# Altium PCB COMECA-PCBv1.PcbDoc
Units mm, origin at the board's own origin, x right, y up, seen from the top; angles counter-clockwise.
Board outline 163.58 x 161.29 mm, 2 copper layers (Top Layer, Bottom Layer); 102 components, 84 nets, 417 pads, 28 vias.
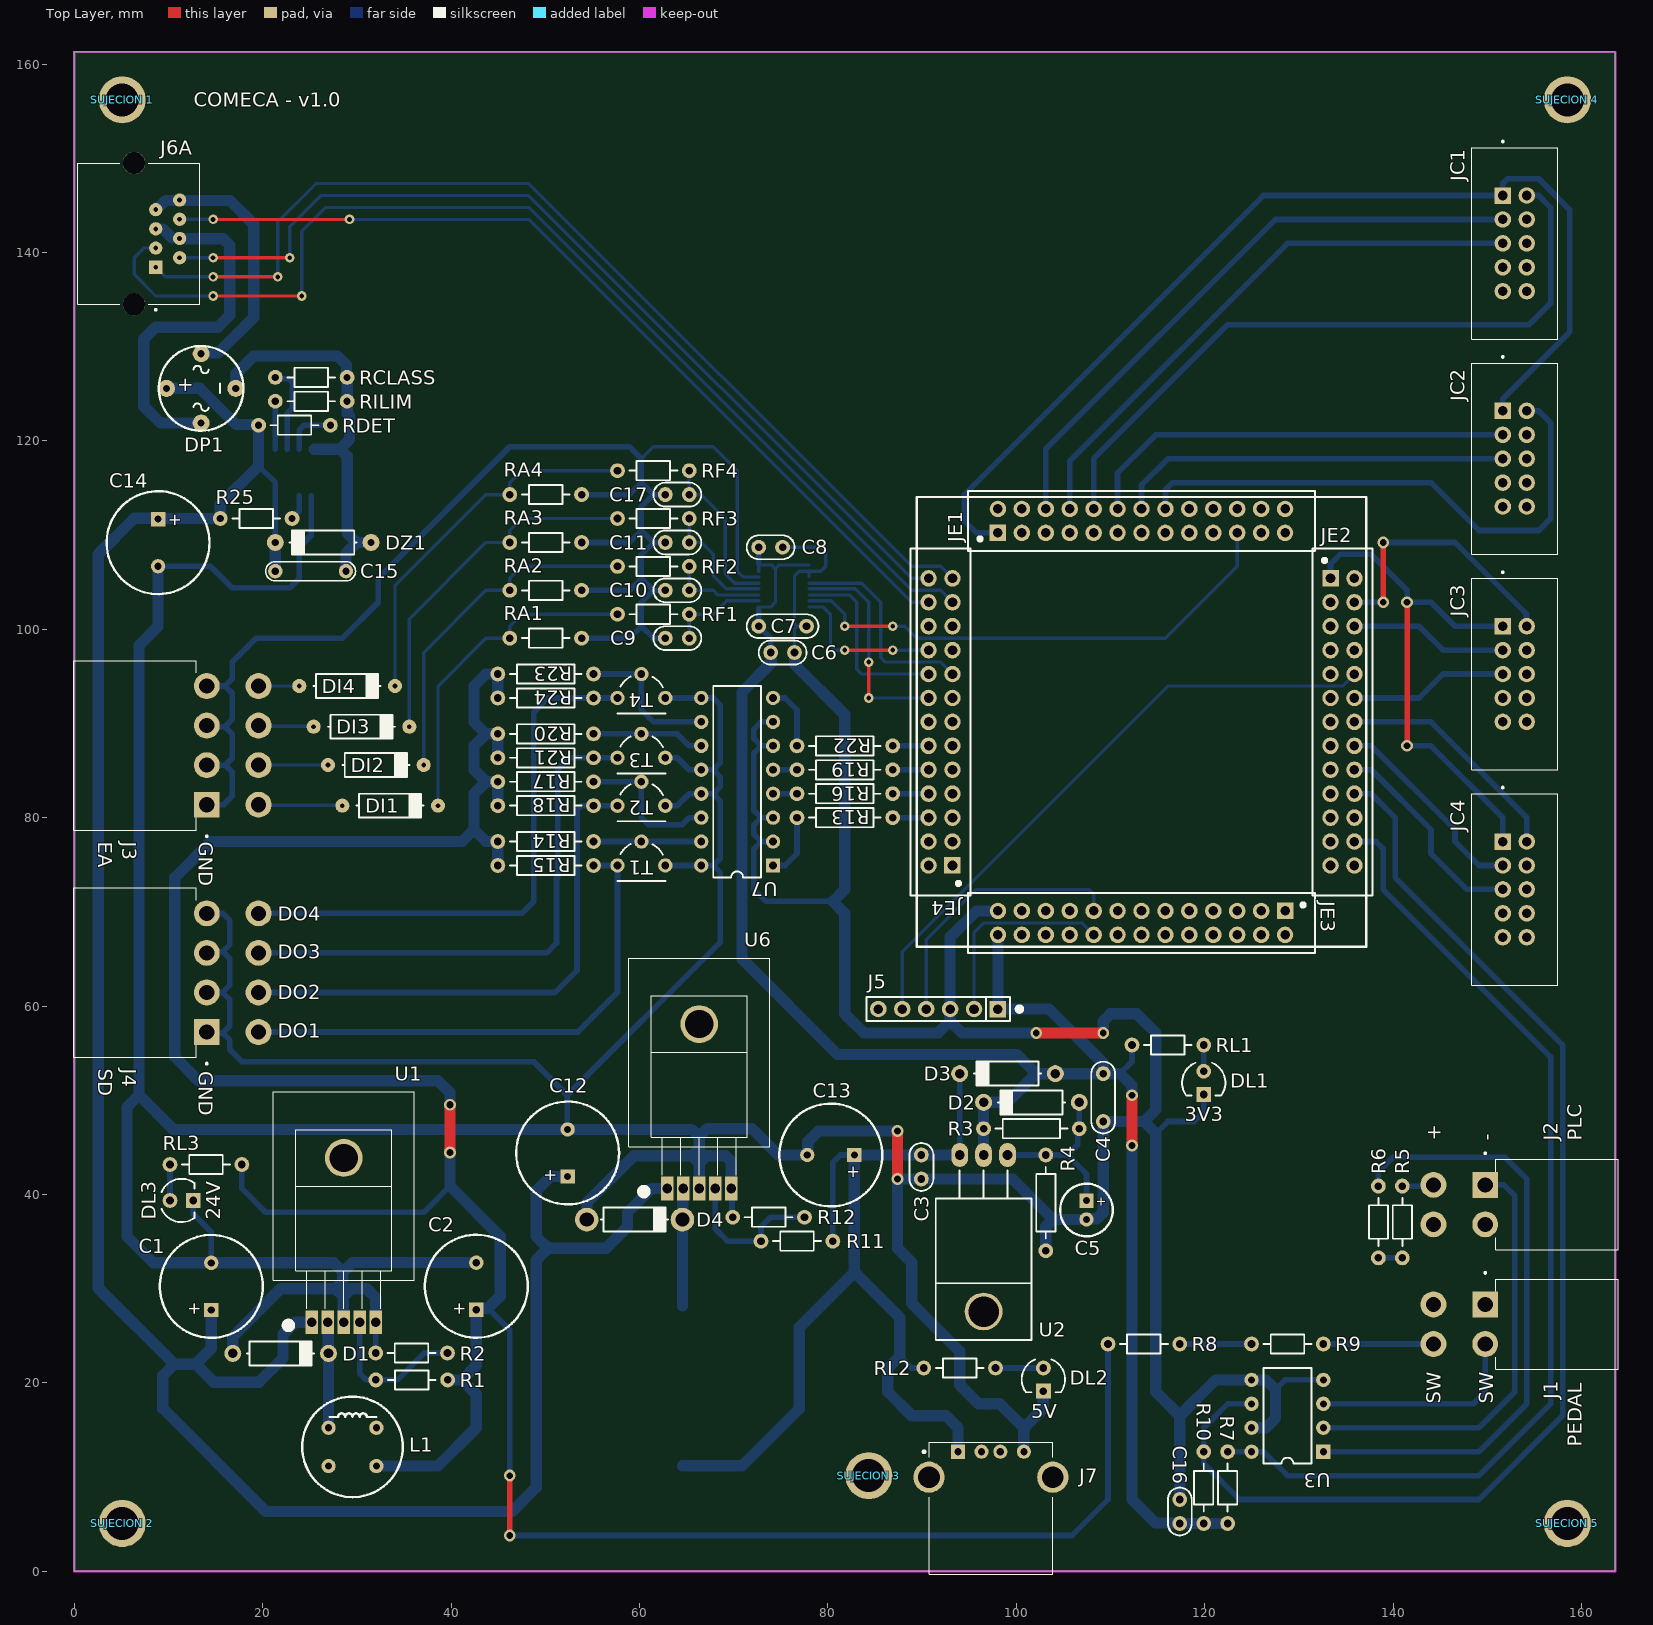
[diagram p0: Top Layer view]
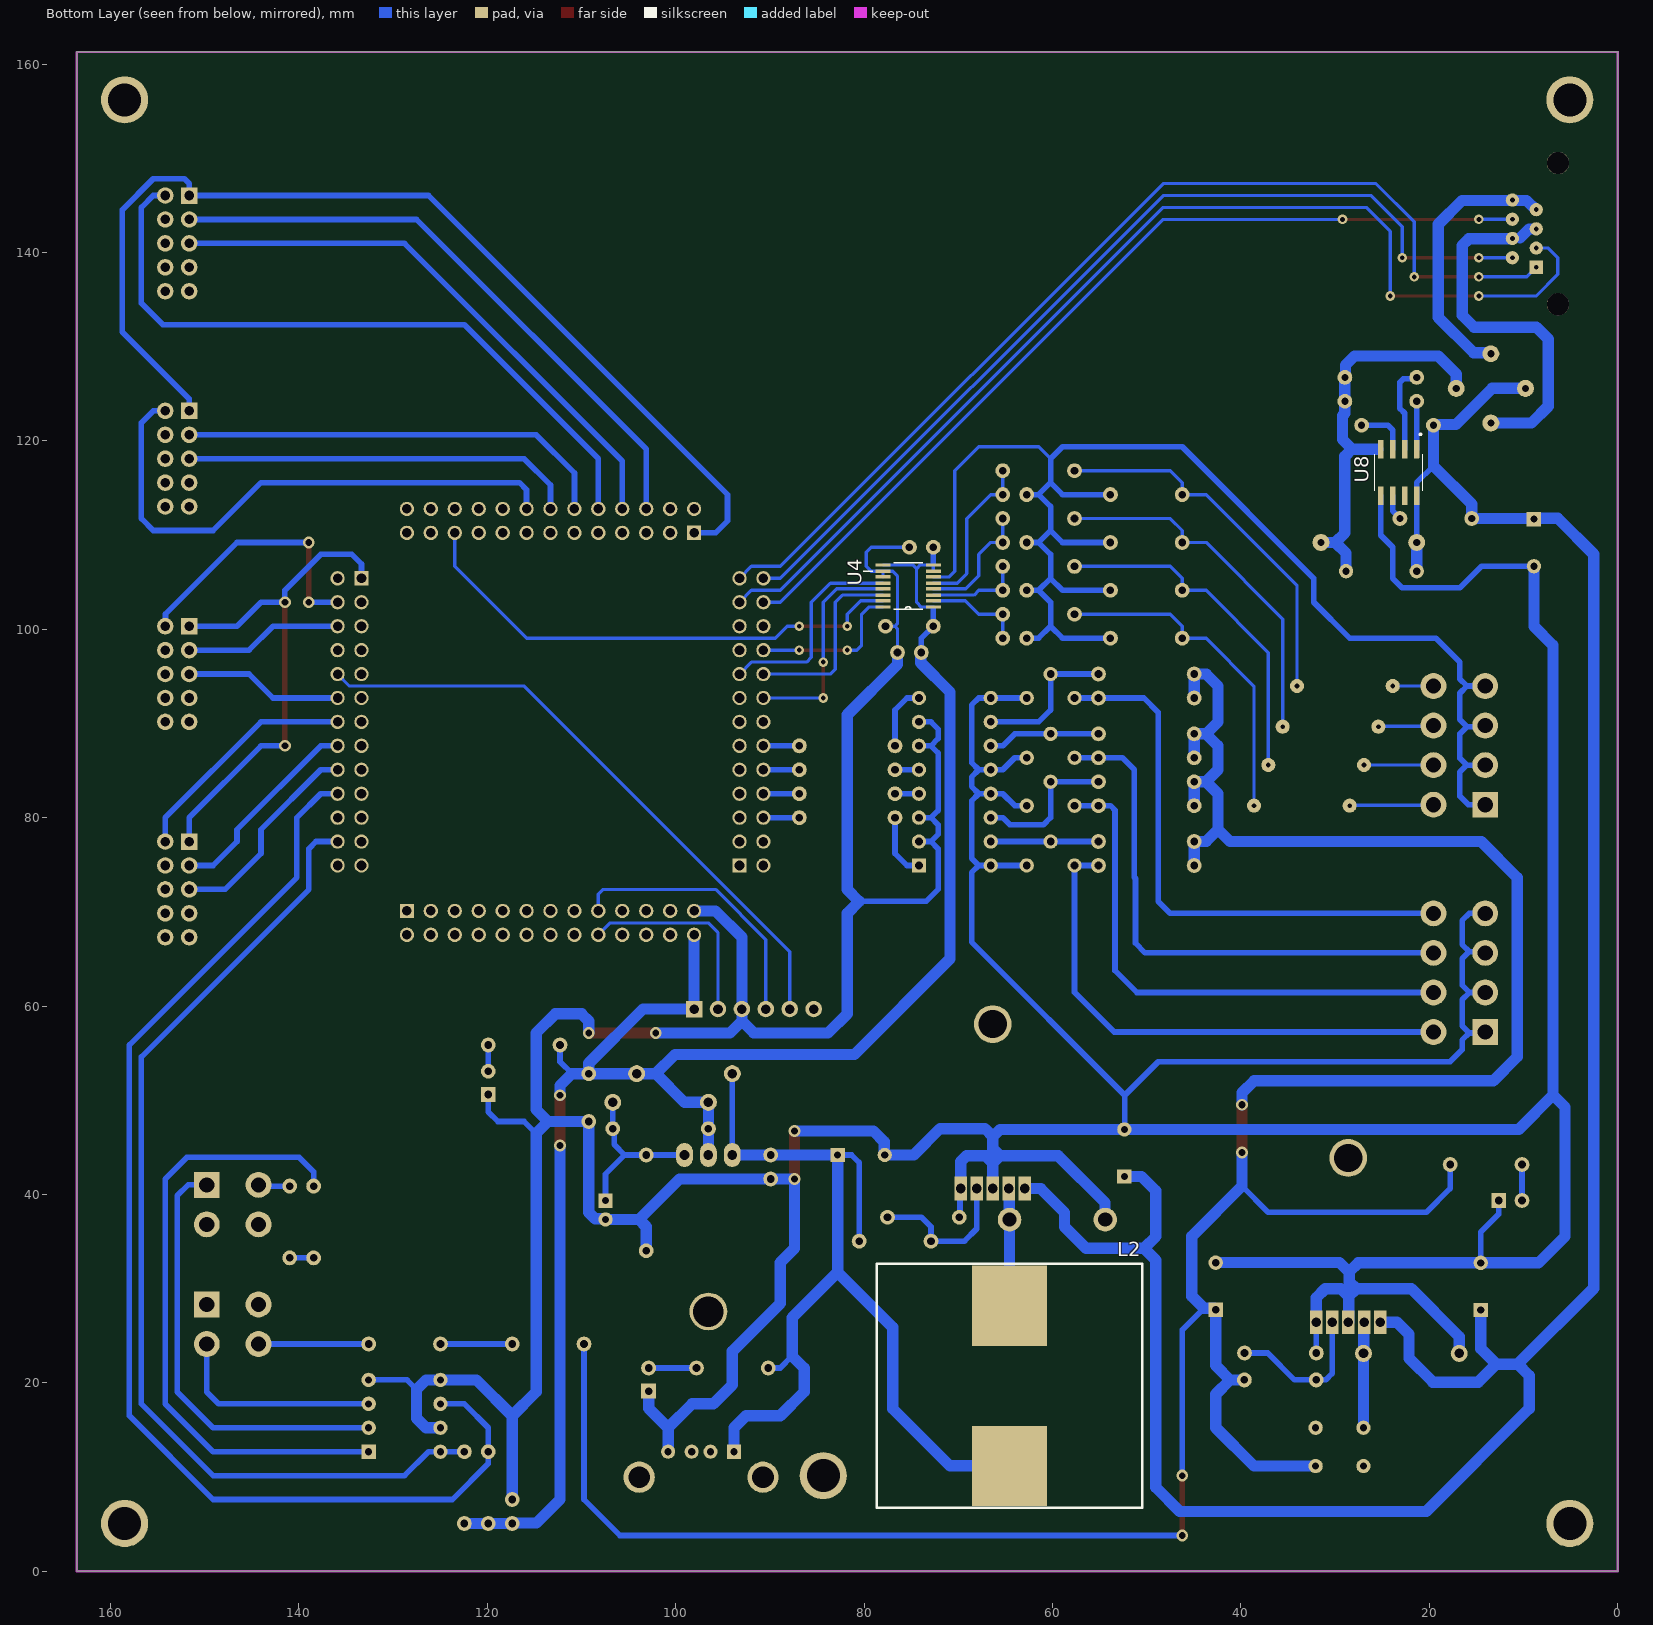
[diagram p1: Bottom Layer view, seen from below]

## Layer stack, top to bottom
Top Solder: solder mask 0.0102, Solder Resist, Dk 3.5
Top Layer: signal copper 0.0356
Dielectric 1: dielectric 0.32, FR-4, Dk 4.8
Bottom Layer: signal copper 0.0356
Bottom Solder: solder mask 0.0102, Solder Resist, Dk 3.5

## Board outline
0,0 163.576,0 163.576,161.29 0,161.29

## Design rules (kind name [scope] priority, off if disabled: settings)
Clearance [All] p1: gap=0.254 ignorepadtopadclearanceinfootprint=TRUE
ComponentClearance [All] p1: gap=0.22 collisioncheckmode=3 verticalgap=0.254 showdistances=FALSE
PolygonConnect [All] p1: connectstyle=Relief reliefconductorwidth=0.254 reliefentries=4 polygonreliefangle="90 Angle" airgapwidth=0.254
RoutingVias [All] p1: holewidth=0.711 width=1.25 viastyle="Through Hole" minholewidth=0.508 minwidth=1 maxholewidth=0.711 maxwidth=1.25
SolderMaskExpansion [All] p1: expansion=0.102 istentingtop=FALSE
Width [All] p1: maxlimit=1.8 minlimit=0.35 preferedwidth=0.6
29 further rules are at their usual default settings.

## Classes and differential pairs
component class COMECA_Main: "SUJECION 1" "SUJECION 2" "SUJECION 3" "SUJECION 4" "SUJECION 5"
component class U_UnidadDeControl-STM: J5 JE1 JE2 JE3 JE4
component class U_SalidasDigitales: J4 R13 R14 R15 R16 R17 R18 R19 R20 R21 R22 R23 R24 T1 T2 T3 T4 U7
component class U_Fuente24VDC: C1 C2 D1 DL3 L1 R1 R2 RL3 U1
component class U_Fuente5VDC: C12 C13 D4 DL2 J7 L2 R11 R12 RL2 U6
component class U_Fuente3.3VDC: C3 C4 C5 D2 D3 DL1 R3 R4 RL1 U2
component class U_EntradasAnalogicas: C6 C7 C8 C9 C10 C11 C17 DI1 DI2 DI3 DI4 J3 RA1 RA2 RA3 RA4 RF1 RF2 RF3 RF4 U4
component class U_ControladorPOE: C14 C15 DP1 DZ1 J6A R25 RCLASS RDET RILIM U8
component class U_ComandosExt: C16 J1 J2 R5 R6 R7 R8 R9 R10 U3
component class U_Calibres: JC1 JC2 JC3 JC4

## Components (designator, comment, footprint, x,y, rotation, side; value= is the part's Value field where it differs from the comment)
C1 "100uFx100V" CAP200RP 14.537,30.245 r90 top
C2 "220uFx50V" CAP200RP 42.671,30.265 r90 top
C3 "0.1uF" CAP100 89.916,42.926 r270 top
C4 "1uF" CAP200 109.22,50.292 r270 top
C5 "10uFx25V" CAP100RP 107.442,38.354 r270 top
C6 "0.1uF" CAP100 75.184,97.536 r0 top
C7 "1uF" CAP200 75.184,100.33 r0 top
C8 "0.1uF" CAP100 73.914,108.712 r0 top
C9 "0.1uF" CAP100 64.008,99.06 r180 top
C10 "0.1uF" CAP100 64.008,104.14 r180 top
C11 "0.1uF" CAP100 64.008,109.22 r180 top
C12 "100uFx100V" CAP200RP 52.364,44.41 r90 top
C13 "680uFx25V" CAP200RP 80.304,44.196 r180 top
C14 "100uFx100V" CAP200RP 8.89,109.199 r270 top
C15 "0.1uFx100V" CAP300 25.086,106.172 r0 top
C16 "0.1uF" CAP100 117.348,6.35 r90 top
C17 "0.1uF" CAP100 64.008,114.3 r180 top
D1 "MUR110" DO41#1 21.903,23.133 r0 top
D2 "1N4007" DO41#1 101.6,49.784 r180 top
D3 "1N4007" DO41#1 99.06,52.832 r180 top
D4 "MUR410" DO41#2 59.476,37.338 r0 top
DI1 "1N4148" DO41#3 33.528,81.28 r0 top
DI2 "1N4148" DO41#3 32.004,85.598 r0 top
DI3 "1N4148" DO41#3 30.48,89.662 r0 top
DI4 "1N4148" DO41#3 28.956,93.98 r0 top
DL1 "3V3" LED3 119.888,51.867 r270 top
DL2 "5V" LED3 102.87,20.371 r270 top
DL3 "24V" LED3 11.379,39.37 r0 top
DP1 "W10M" "PUENTE - W10M" 9.785,125.576 r90 top
DZ1 "1N4758" DO41#4 26.416,109.22 r180 top
J1 "PEDAL" TE_1586863-4 149.772,28.33 r90 top
J2 "PLC" TE_1586863-4 149.772,41.03 r90 top
J3 "ANALOG IN" TE_1586863-8 14.058,81.38 r270 top
J4 "DIGITAL OUT" TE_1586863-8 14.058,57.25 r270 top
J5 "PROGRAMMER" SIP6 98.044,59.69 r180 top
J6A "RJ45" CUI_CRJ032-1-TH 6.336,142 r270 top
J7 "USB-TYPE-A" TE_6364372-2 97.298,9.99 r0 top
JC1 "CAL_1" "TE_5104338-1 - 90DEG" 151.638,146.05 r90 top locked
JC2 "CAL_2" "TE_5104338-1 - 90DEG" 151.638,123.19 r90 top locked
JC3 "CAL_3" "TE_5104338-1 - 90DEG" 151.638,100.33 r90 top locked
JC4 "CAL_4" "TE_5104338-1 - 90DEG" 151.638,77.47 r90 top locked
JE1 "SIP13" "SIP13*2 - HDR" 98.044,110.236 r0 top
JE2 "SIP13" "SIP13*2 - HDR" 133.35,105.41 r270 top
JE3 "SIP13" "SIP13*2 - HDR" 128.524,70.104 r180 top
JE4 "SIP13" "SIP13*2 - HDR" 93.218,74.93 r90 top
L1 "2200uH" CHOKE10.5 29.523,13.208 r0 top
L2 "220uH" CHOKE_PAD 64.556,19.694 r180 bottom
R1 "1K" RES300#1 32.004,20.32 r0 top
R2 "18K" RES300#1 31.985,23.173 r0 top
R3 "240" RES400 106.68,46.99 r180 top
R4 "390" RES400 103.124,34.036 r90 top
R5 "1K" RES300#1 140.97,40.894 r270 top
R6 "150" RES300#1 138.43,33.274 r90 top
R7 "680" RES300#1 122.428,12.7 r270 top
R8 "1K" RES300#1 109.728,24.13 r0 top
R9 "150" RES300#1 124.968,24.13 r0 top
R10 "680" RES300#1 119.888,12.7 r270 top
R11 "1K" RES300#1 72.898,35.052 r0 top
R12 "3.09K" RES300#1 69.89,37.592 r0 top
R13 "220" RES400 86.868,80.01 r180 top
R14 "4K7" RES400 55.118,77.47 r180 top
R15 "4K7" RES400 55.118,74.93 r180 top
R16 "220" RES400 86.868,82.55 r180 top
R17 "4K7" RES400 55.118,83.82 r180 top
R18 "4K7" RES400 55.118,81.28 r180 top
R19 "220" RES400 86.868,85.09 r180 top
R20 "4K7" RES400 55.118,88.9 r180 top
R21 "4K7" RES400 55.118,86.36 r180 top
R22 "220" RES400 86.868,87.63 r180 top
R23 "4K7" RES400 55.118,95.25 r180 top
R24 "4K7" RES400 55.118,92.71 r180 top
R25 "100K" RES300#2 23.114,111.76 r180 top
RA1 "150" RES300#1 53.848,99.06 r180 top
RA2 "150" RES300#1 53.848,104.14 r180 top
RA3 "150" RES300#1 53.848,109.22 r180 top
RA4 "150" RES300#1 53.848,114.3 r180 top
RCLASS "4K42" RES300#2 28.956,126.746 r180 top
RDET "24K9" RES300#2 27.178,121.666 r180 top
RF1 "3K3" RES300#1 57.658,101.6 r0 top
RF2 "3K3" RES300#1 57.658,106.68 r0 top
RF3 "3K3" RES300#1 57.658,111.76 r0 top
RF4 "3K3" RES300#1 57.658,116.84 r0 top
RILIM "160K" RES300#2 28.956,124.206 r180 top
RL1 "330" RES300#1 119.888,55.88 r180 top
RL2 "680" RES300#1 97.79,21.59 r180 top
RL3 "4K7" RES300#1 10.16,43.18 r0 top
"SUJECION 1" "SUJECION" "SUJECION (5.00MM - 3.50MM)" 5.08,156.21 r90 top
"SUJECION 2" "SUJECION" "SUJECION (5.00MM - 3.50MM)" 5.08,5.08 r90 top
"SUJECION 3" "SUJECION" "SUJECION (5.00MM - 3.50MM)" 84.328,10.16 r90 top
"SUJECION 4" "SUJECION" "SUJECION (5.00MM - 3.50MM)" 158.496,156.21 r90 top
"SUJECION 5" "SUJECION" "SUJECION (5.00MM - 3.50MM)" 158.496,5.08 r90 top
T1 "BC338" TO92 60.198,76.2 r180 top
T2 "BC338" TO92 60.198,82.55 r180 top
T3 "BC338" TO92 60.198,87.63 r180 top
T4 "BC338" TO92 60.198,93.98 r180 top
U1 "LM2575HV-ADJ" "TO-220_5 H" 28.605,26.435 r0 top
U2 "LM317" "TO-220 H" 96.52,36.576 r180 top
U3 "TLP521" DIP8 132.588,12.7 r180 top
U4 "ADS7841E/2K5" SOP63P600X175-16N 75.311,104.597 r0 bottom
U6 "LM2576HV-ADJ" "TO-220_5 H" 66.334,40.64 r0 top
U7 "CNY74-4H" DIP16 74.168,74.93 r180 top
U8 "TPS2375D" SOIC127P599X175-8N 23.241,116.656 r270 bottom

## Footprints (in the part's own frame and the unit in brackets; to place one, negate y for a bottom-side part, rotate by r counter-clockwise, add the part's x,y. Pads: shape width x height; smd on the part's side, far side on the other; paste and mask are expansions set on the pad)
CAP100 [mil]
  round 62 hole 32: 1(-50,0) 2(50,0)
  silkscreen extent -100,-50 100,50, body extent -115,-33 115,34, height 241
CAP100RP [mil] "Body diameter 5mm"
  rect 60x60 hole 30: 1(-39.37,0)
  round 60 hole 30: 2(39.37,0)
  silkscreen extent -110,-110 110,110, body extent -99,-99 99,100, height 454
CAP200 [mil]
  round 62 hole 32: 1(-100,0) 2(100,0)
  silkscreen extent -150,-50 150,50, body extent -110,-46 110,44, height 246
CAP200RP [mil] "Body Diameter 10.33mm"
  rect 60x60 hole 30: 1(-98.43,0)
  round 60 hole 30: 2(98.43,0)
  silkscreen extent -215,-215 215,215, body extent -205,-204 204,205, height 787
CAP300 [mil] "Capacitor Poliester 8mm"
  round 60 hole 30: 1(-147.64,0) 2(147.64,0)
  silkscreen extent -188,-40 188,40
CHOKE10.5 [mil] "Choke Inductor 10.5mm"
  round 60 hole 30: 1(-100,80) 2(100,-80) NC(-100,-80) NC(100,80)
  silkscreen extent -210,-210 210,210, body extent -213,-213 213,213, height 715
CHOKE_PAD [mm] "Choke Inductor SMD"
  rect 8x8.5 smd: 1(0,8.5) 2(0,-8.5)
  silkscreen extent -14.1,-12.95 14.1,12.95, body extent -13.65,-11.55 13.65,11.55, height 20
CUI_CRJ032-1-TH [mm]
  rect 1.408x1.408 hole 0.508: 1(3.57,2.3)
  round 1.408 hole 0.508: 2(2.55,4.84) 3(1.53,2.3) 4(0.51,4.84) 5(-0.51,2.3) 6(-1.53,4.84) 7(-2.55,2.3) 8(-3.57,4.84)
  round 2.36 hole 2.36 unplated: ""(-7.5,0) ""(7.5,0)
  silkscreen extent -7.5,-6 8.17,7
DIP8 [mil]
  rect 60x60 hole 30: 1(0,0)
  round 60 hole 30: 2(0,-100) 3(0,-200) 4(0,-300) 5(300,-300) 6(300,-200) 7(300,-100) 8(300,0)
  silkscreen extent 50,-350 250,50, body extent -3,-363 303,63, height 177
DIP16 [mil]
  rect 60x60 hole 32: 1(0,0)
  round 60 hole 32: 2(0,-100) 3(0,-200) 4(0,-300) 5(0,-400) 6(0,-500) 7(0,-600) 8(0,-700) 9(300,-700) 10(300,-600) 11(300,-500) 12(300,-400) 13(300,-300) 14(300,-200) 15(300,-100) 16(300,0)
  silkscreen extent 50,-750 250,50, body extent -3,-744 307,44, height 78
DO41#1 [mm]
  round 1.8 hole 1.016: 1(-5.08,0) 2(5.08,0)
  silkscreen extent -3.56,-1.27 3.56,1.27, body extent -5.46,-1.19 5.46,1.37, height 2.03
DO41#2 [mm]
  round 2.5 hole 1.5: 1(-5.08,0) 2(5.08,0)
  silkscreen extent -3.56,-1.27 3.56,1.27, body extent -5.46,-1.19 5.46,1.37, height 2.03
DO41#3 [mm]
  round 1.5 hole 0.508: 1(-5.08,0) 2(5.08,0)
  silkscreen extent -3.56,-1.27 3.56,1.27, body extent -5.46,-1.19 5.46,1.37, height 2.03
DO41#4 [mm]
  round 1.8 hole 0.762: 1(-5.08,0) 2(5.08,0)
  silkscreen extent -3.56,-1.27 3.56,1.27, body extent -5.46,-1.19 5.46,1.37, height 2.03
LED3 [mil]
  round 62 hole 32: 1(-48,0)
  rect 62x62 hole 32: 2(49,0)
  silkscreen extent -84,-90 54,90, body extent -65,-64 65,65, height 19
"PUENTE - W10M" [mm]
  round 1.8 hole 0.762: 1(0,0) 2(-3.677,-3.677) 3(0,-7.354) 4(3.677,-3.677)
  silkscreen extent -4.5,-8.18 4.5,0.82
RES300#1 [mil]
  round 62 hole 32: 1(0,0) 2(300,0)
  silkscreen extent 50,-40 250,40, body extent -10,-38 310,38, height 79
RES300#2 [mil]
  round 62 hole 30: 1(0,0) 2(300,0)
  silkscreen extent 50,-40 250,40, body extent -10,-38 310,38, height 79
RES400 [mil]
  round 62 hole 32: 1(0,0) 2(400,0)
  silkscreen extent 50,-40 350,40, body extent -12,-45 412,46, height 96
SIP6 [mm]
  rect 1.75x1.75 hole 1.016: 1(0,0)
  round 1.75 hole 1.016: 2(2.54,0) 3(5.08,0) 4(7.62,0) 5(10.16,0) 6(12.7,0)
  silkscreen extent -1.27,-1.27 13.97,1.27, body extent -1.27,-1.3 13.97,1.24, height 8.38
"SIP13*2 - HDR" [mm]
  rect 1.75x1.75 / inner rect 1.524x1.524 / far side rect 1.524x1.524 hole 1.016: 1(0,0)
  round 1.75 / inner round 1.524 / far side round 1.524 hole 1.016: 2(0,2.54) 3(2.54,0) 4(2.54,2.54) 5(5.08,0) 6(5.08,2.54) 7(7.62,0) 8(7.62,2.54) 9(10.16,0) 10(10.16,2.54) 11(12.7,0) 12(12.7,2.54) 13(15.24,0) 14(15.24,2.54) 15(17.78,0) 16(17.78,2.54) 17(20.32,0) 18(20.32,2.54) 19(22.86,0) 20(22.86,2.54) 21(25.4,0) 22(25.4,2.54) 23(27.94,0) 24(27.94,2.54) 25(30.48,0) 26(30.48,2.54)
  silkscreen extent -3.17,-1.91 33.66,4.44, body extent -1.52,-1.21 32,3.75, height 8.51
SOIC127P599X175-8N [mm]
  rrect25% 1.97x0.6 smd: 1(-2.47,1.905) 2(-2.47,0.635) 3(-2.47,-0.635) 4(-2.47,-1.905) 5(2.47,-1.905) 6(2.47,-0.635) 7(2.47,0.635) 8(2.47,1.905)
  silkscreen extent -4.14,-2.52 1.95,2.52, body extent -3,-2.45 3,2.45, height 1.75
SOP63P600X175-16N [mil]
  rect 63x14 smd: 1(-105,88) 2(-105,62) 3(-105,38) 4(-105,12) 5(-105,-12) 6(-105,-38) 7(-105,-62) 8(-105,-88) 9(105,-88) 10(105,-62) 11(105,-38) 12(105,-12) 13(105,12) 14(105,38) 15(105,62) 16(105,88)
  silkscreen extent -61,-98 188,98, body extent -118,-96 118,97, height 69
"SUJECION (5.00MM - 3.50MM)" [mm]
  round 5 hole 3.5: 1(0,0)
TE_1586863-4 [mm]
  rect 2.75x2.75 hole 1.6: 1(0,0)
  round 2.75 hole 1.6: 2(0,5.5) 3(-4.2,0) 4(-4.2,5.5)
  silkscreen extent -6.9,-14.1 3.45,0.1, body extent -6.8,-14.13 3.3,6, height 11.25
TE_1586863-8 [mm]
  rect 2.75x2.75 hole 1.6: 1(0,0)
  round 2.75 hole 1.6: 2(0,5.5) 3(-4.2,0) 4(-4.2,5.5) 5(-8.4,0) 6(-8.4,5.5) 7(-12.6,0) 8(-12.6,5.5)
  silkscreen extent -15.3,-14.1 3.45,0.1, body extent -15.32,-14 3.18,6.13, height 11.25
"TE_5104338-1 - 90DEG" [mm]
  rect 1.75x1.75 hole 1.016: 1(0,0)
  round 1.75 hole 1.016: 2(0,-2.54) 3(-2.54,0) 4(-2.54,-2.54) 5(-5.08,0) 6(-5.08,-2.54) 7(-7.62,0) 8(-7.62,-2.54) 9(-10.16,0) 10(-10.16,-2.54)
  silkscreen extent -15.24,-5.84 5.83,3.3, body extent -15.24,-12.19 5.08,0.32, height 9.27
TE_6364372-2 [mm]
  rect 1.5x1.5 hole 0.762: 1(-3.5,2.71)
  round 1.5 hole 0.762: 2(-1,2.71) 3(1,2.71) 4(3.5,2.71)
  round 3.316 hole 2.3: SH1(-6.57,0) SH2(6.57,0)
  silkscreen extent -7.2,-10.28 6.57,3.72, body extent -7.26,-10.3 7.37,3.7, height 7.69
TO92 [mil]
  round 60 hole 32: 1(0,-50) 2(100,50) 3(-100,50)
  silkscreen extent -100,-39 100,115, body extent -110,-61 110,110, height 315
"TO-220 H" [mil]
  oval 70x100 hole 40: 1(-100,-300) 2(0,-300) 3(100,-300)
  round 157.48 hole 127.95: 4(0,354.33)
  silkscreen extent -200,-235 200,472, body extent -200,-308 200,452, height 175
"TO-220_5 H" [mm]
  rect 1.3x2.5 hole 1.016: 1(-3.4,0) 2(-1.7,0) 3(0,0) 4(1.7,0) 5(3.4,0)
  round 4 hole 3: 6(0,17.45)
  Top Layer pour cut-out: -8.184,3.646 8.176,3.646 8.191,25.196 -8.184,25.196
  silkscreen extent -7.5,-0.7 7.5,24.45, body extent -5.08,-0.2 5.08,19.96, height 6.06

## Part data
C1 C2 C5 C12 C13 C14: library part CAPPOL
C3 C4 C6 C7 C8 C9 C10 C11 C15 C16 C17: library part CAP
D1 D4: library part "DIODO SCHOTTKY"
D2 D3 DI1 DI2 DI3 DI4: library part DIODO
DL1 DL2 DL3: library part LED
DP1: library part PUENTE
DZ1: library part "DIODO ZENER"
J1 J2: library part 1586863-4, "Conn Power HDR 4 POS 4.2mm Solder RA Thru-Hole 4 Terminal 1 Port Tray", Package=None, Availability=Unavailable, EU_RoHS_Compliance=Compliant, MF="TE Connectivity", MP=1586863-4, Price=None, SnapEDA_Link=https://www.snapeda.com/parts/1586863-4/TE%20Connectivity%20AMP%20Connectors/view-part/1401879/?ref=snap, TE_purchase_URL=https://www.te.com/usa-en/product-1586863-4.html?te_bu=Cor&te_type=disp&te_campaign=seda_glo_cor-seda-global-disp-prtnr-fy19-seda-model-bom-cta_sma-317_1&elqCampaignId=32493
J3 J4: library part 1586863-8, "Conn Power HDR 8 POS 4.2mm Solder RA Thru-Hole 8 Terminal 1 Port Tray", Package=None, Availability=Unavailable, EU_RoHS_Compliance=Compliant, MF="TE Connectivity", MP=1586863-8, Price=None, SnapEDA_Link=https://www.snapeda.com/parts/1586863-8/TE%20Connectivity%20AMP%20Connectors/view-part/1404500/?ref=snap, TE_purchase_URL=https://www.te.com/usa-en/product-1586863-8.html?te_bu=Cor&te_type=disp&te_campaign=seda_glo_cor-seda-global-disp-prtnr-fy19-seda-model-bom-cta_sma-317_1&elqCampaignId=32493
J5: library part CON6
J6A: library part CRJ032-1-TH, "8P8C, Single Port, Horizontal, Unshielded, No LED, Through Hole, RJ45 Modular Connector", Package=None, Availability="In Stock", Check_prices=https://www.snapeda.com/parts/CRJ032-1-TH/CUI%20Devices/view-part/6363031/?ref=eda, CUI_purchase_URL=https://www.cuidevices.com/product/interconnect/connectors/modular-connectors/rj45-connectors/crj032-1-th?utm_source=snapeda.com&utm_medium=referral&utm_campaign=snapedaBOM, MF="CUI Devices", MP=CRJ032-1-TH, Price=None, Purchase-URL=https://pricing.snapeda.com/search/part/CRJ032-1-TH/?ref=eda, SnapEDA_Link=https://www.snapeda.com/parts/CRJ032-1-TH/CUI%20Devices/view-part/6363031/?ref=snap
J7: library part 6364372-2, "Conn USB 2.0 Type A RCP 4 POS Solder RA Thru-Hole 4 Terminal 1 Port Box/Tube", Package=None, Digi-Key_Part_Number=A122647-ND, Digi-Key_Purchase_URL=https://www.digikey.com/product-detail/en/te-connectivity-amp-connectors/6364372-2/A122647-ND/2286712?utm_source=snapeda&utm_medium=aggregator&utm_campaign=symbol, EU_RoHS_Compliance=Compliant, MF="TE Connectivity", MP=6364372-2, SnapEDA_Link=https://www.snapeda.com/parts/6364372-2/TE%20Connectivity%20AMP%20Connectors/view-part/2053020/?ref=snap, TE_purchase_URL=https://www.te.com/usa-en/product-6364372-2.html?te_bu=Cor&te_type=disp&te_campaign=seda_glo_cor-seda-global-disp-prtnr-fy19-seda-model-bom-cta_sma-317_1&elqCampaignId=32493
JC1 JC2 JC3 JC4: library part 5104338-1, "HEADER; PIN; AMP-LATCH; 10 POS; 2.54 X 2.54; VERTICAL; LOW PROFILE; PCB", Package=None, Availability=Unavailable, MF="TE Connectivity", MP=5104338-1, Price=None, SnapEDA_Link=https://www.snapeda.com/parts/5104338-1/TE%20Connectivity%20AMP%20Connectors/view-part/2881080/?ref=snap, TE_purchase_URL=https://www.te.com/usa-en/product-5104338-1.html?te_bu=Cor&te_type=disp&te_campaign=seda_glo_cor-seda-global-disp-prtnr-fy19-seda-model-bom-cta_sma-317_1&elqCampaignId=32493
JE1 JE2 JE3 JE4: library part CON13*2
L1 L2: library part Choke
R1 R2 R3 R4 R5 R6 R7 R8 R9 R10 R11 R12 R13 R14 R15 R16 R17 R18 R19 R20 R21 R22 R23 R24 R25 RA1 RA2 RA3 RA4 RCLASS RDET RF1 RF2 RF3 RF4 RILIM RL1 RL2 RL3: library part RES
T1 T2 T3 T4: library part "TRANSISTOR NPN"
U1 U6: library part LM2575, "LM2575"
U2: "IC REG ADJ 1.5A 3 TERM TO-220"
U3: library part TLP521-2, "PhotoCoupler"
U4: "ANALOG-TO-DIGITAL CONVERTER", Package=None, Availability=Unavailable, MP=ADS7841E/2K5, Price=None
U8: "Class 3 PoE PD with latch protection 8-SOIC -40 to 85", Package="SOIC-8 Texas Instruments", Check_prices=https://www.snapeda.com/parts/TPS2375D/Texas%20Instruments/view-part/570877/?ref=eda, Digi-Key_Part_Number=296-26922-2-ND, MF="Texas Instruments", MP=TPS2375D, Purchase-URL=https://pricing.snapeda.com/search/part/TPS2375D/?ref=eda, SnapEDA_Link=https://www.snapeda.com/parts/TPS2375D/Texas%20Instruments/view-part/570877/?ref=snap

## Via types
v1: diameter 1.016, hole 0.508, Top Layer to Bottom Layer, 14 vias
v2: diameter 1.25, hole 0.711, Top Layer to Bottom Layer, 12 vias
v3: diameter 1.25, hole 0.762, Top Layer to Bottom Layer, 2 vias

## Nets (pads, with @x,y where several pads share a name; then routed paths per layer and width w, separated by ;. In a path a pad name is that pad's centre, name@x,y a point inside that pad or via, vN(x,y) a via of type N, cw(c..) or ccw(c..) an arc to the next point about the centre after c; other vN are vias at no path point)
3.3VDC: C4.1 C6.1 C7.1 C8.1 C16.1 D2.2 D3.1 J5.1 JE3.26 R3.2 R7.2 R10.2 RL1.2 U2.2 U4.1 U4.7 U4.8 U4.9 | length 193.4
  Top Layer w1.2: v2(112.268,45.212) v2(112.268,50.546)
  Bottom Layer w0.35: U4.1 73.914,102.362 74.422,102.87 74.422,106.426 ; U4.7 U4.8 74.016,106.832 74.422,106.426 ; U4.9 74.828,106.832 74.422,106.426
  Bottom Layer w0.6: U4.1@72.644,102.24 C7.1 73.914,99.06 C6.1 ; U4.8@72.644,106.96 C8.1 ; 110.998,52.832 112.268,54.102 RL1.2
  Bottom Layer w1.2: C6.1 73.986,97.464 73.986,96.448 70.866,93.329 70.866,65.024 81.026,54.864 100.076,54.864 102.108,52.832 ; U2.2 R3.2 D2.2 99.06,49.784 102.108,52.832 ; JE3.26 J5.1 103.459,59.69 109.22,53.929 C4.1 ; v2(112.268,45.212) 112.268,7.62 114.761,5.127 117.301,5.127 C16.1 R10.2 R7.2 ; v2(112.268,50.546) 112.268,51.562 110.998,52.832 C4.1 ; 102.108,52.832 D3.1 C4.1
24VDC: C2.1 L1.2 R1.2 R8.1 R14.2 R15.2 R17.2 R18.2 R20.2 R21.2 R23.2 R24.2 RL3.2 | length 307.9
  Top Layer w0.6: v2(46.228,3.81) v2(46.228,10.16)
  Top Layer w1.2: v3(39.878,44.45) v3(39.878,49.53)
  Bottom Layer w0.6: RL3.2 17.78,40.64 20.32,38.1 37.084,38.1 39.878,40.894 ; 43.929,27.927 46.228,25.629 v2(46.228,10.16) ; v2(46.228,3.81) 105.918,3.81 109.728,7.62 R8.1
  Bottom Layer w1.2: L1.2 38.608,11.176 42.671,15.239 42.671,18.797 41.148,20.32 ; R1.2 41.148,20.32 ; v3(39.878,44.45) 39.878,40.894 45.212,35.56 45.212,29.21 43.929,27.927 42.833,27.927 C2.1 42.671,21.843 41.148,20.32 ; v3(39.878,49.53) 39.878,50.8 38.608,52.07 13.208,52.07 10.668,54.61 10.668,73.66 14.478,77.47 41.148,77.47 42.418,78.74 ; R15.2 R14.2 43.688,77.47 42.418,78.74 ; R18.2 R17.2 43.688,83.82 ; R21.2 R20.2 43.688,88.9 ; R24.2 R23.2 43.688,95.25 42.418,93.98 42.418,90.17 43.688,88.9 ; 42.418,78.74 42.418,82.55 43.688,83.82 ; 43.688,83.82 42.418,85.09 42.418,87.63 43.688,88.9
AN1: DI1.1 J3.2 | length 8.9
  Bottom Layer w0.35: J3.2 19.608,81.33 28.398,81.33 DI1.1
AN2: DI2.1 J3.4 | length 7.4
  Bottom Layer w0.35: J3.4 19.567,85.589 26.915,85.589 DI2.1
AN3: DI3.1 J3.6 | length 5.9
  Bottom Layer w0.35: J3.6 19.617,89.721 25.341,89.721 DI3.1
AN4: DI4.1 J3.8 | length 4.3
  Bottom Layer w0.35: J3.8 DI4.1
ANALOG_GND_A: C9.2 C10.2 C11.2 C17.2 J3.1 J3.3 J3.5 J3.7 RA1.1 RA2.1 RA3.1 RA4.1 U4.6 | length 160.3
  Bottom Layer w0.35: 60.198,118.11 61.468,119.38 67.818,119.38 70.358,116.84 70.358,106.172 70.968,105.562 U4.6
  Bottom Layer w0.6: J3.1 15.848,81.38 16.764,82.296 16.764,84.836 16.02,85.58 ; J3.3 16.02,85.58 ; J3.5 14.176,89.662 16.002,89.662 ; J3.7 16.002,93.98 ; RA1.1 58.928,99.06 60.198,100.33 ; RA2.1 58.928,104.14 60.198,105.41 ; RA3.1 58.928,109.22 60.198,110.49 ; RA4.1 58.928,114.3 60.198,115.57 ; C9.2 61.468,99.06 60.198,100.33 ; C10.2 61.468,104.14 ; C11.2 61.468,109.22 ; C17.2 61.468,114.3 ; 16.002,89.662 16.764,90.424 16.764,93.218 16.002,93.98 ; 16.002,89.662 16.764,88.9 16.764,86.324 16.02,85.58 ; 16.002,93.98 16.764,94.742 16.764,96.52 19.304,99.06 28.448,99.06 32.258,102.87 32.258,105.41 46.228,119.38 58.928,119.38 60.198,118.11 60.198,115.57 ; 60.198,100.33 60.198,102.87 61.468,104.14 ; 60.198,105.41 61.468,104.14 ; 60.198,105.41 60.198,107.95 61.468,109.22 ; 60.198,110.49 61.468,109.22 ; 60.198,110.49 60.198,113.03 61.468,114.3 ; 60.198,115.57 61.468,114.3
BUSY_A: JE4.16 U4.13 | length 23.4
  Top Layer w0.35: v1(84.328,92.71) v1(84.328,96.52)
  Bottom Layer w0.35: U4.13 82.906,104.292 84.328,102.87 v1(84.328,96.52) ; v1(84.328,92.71) JE4.16
CS_A: JE1.21 U4.15 | length 54.6
  Top Layer w0.35: v1(81.788,100.33) v1(86.868,100.33)
  Bottom Layer w0.35: U4.15 80.366,103.022 81.788,101.6 v1(81.788,100.33) ; v1(86.868,100.33) 88.138,100.33 89.408,99.06 115.824,99.06 123.444,106.68 JE1.21
DCLK_A: JE4.20 U4.16 | length 16.5
  Top Layer w0.35: v1(81.788,97.79) v1(86.868,97.79)
  Bottom Layer w0.35: U4.16 79.502,102.362 80.264,101.6 80.264,98.298 80.772,97.79 v1(81.788,97.79) ; v1(86.868,97.79) JE4.20
DIG_OUT1: J4.2 R15.1 T1.2 | length 55.8
  Bottom Layer w0.6: J4.2 53.44,57.25 57.658,61.468 T1.2 R15.1
DIG_OUT2: J4.4 R18.1 T2.2 | length 56.3
  Bottom Layer w0.6: J4.4 51.036,61.45 53.358,63.772 53.358,80.79 53.848,81.28 R18.1 T2.2
DIG_OUT3: J4.6 R21.1 T3.2 | length 57.4
  Bottom Layer w0.6: J4.6 50.156,65.65 51.19,66.684 51.19,73.542 51.308,73.66 51.308,85.09 52.578,86.36 R21.1 T3.2
DIG_OUT4: J4.8 R24.1 T4.2 | length 59.3
  Bottom Layer w0.6: J4.8 47.498,69.85 48.768,71.12 48.768,91.186 50.292,92.71 R24.1 T4.2
DIN_A: JE4.18 U4.14 | length 20.3
  Bottom Layer w0.35: U4.14 82.296,103.632 83.058,102.87 83.058,95.758 83.566,95.25 JE4.18
DOUT_A: JE4.17 U4.12 | length 22.7
  Bottom Layer w0.35: U4.12 83.566,104.902 85.598,102.87 85.598,97.028 86.106,96.52 91.948,96.52 JE4.17
GND: C1.2 C2.2 C3.2 C4.2 C5.2 C6.2 C7.2 C8.2 C12.2 C13.2 C14.2 C16.2 D1.1 D4.1 DL1.2 DL2.2 DL3.2 J4.1 J4.3 J4.5 J4.7 J5.3 J7.4 JE3.25 R2.1 R4.1 R12.1 T1.3 T2.3 T3.3 T4.3 U1.3 U1.5 U3.4 U3.5 U3.7 U4.10 U4.11 U6.3 U6.5 U7.2 U7.3 U7.6 U7.7 U7.9 U7.12 U7.13 U7.16 U8.5 | length 748.3
  Top Layer w1.2: v2(87.376,41.656) v2(87.376,46.736) ; v2(102.108,57.15) v2(109.22,57.15)
  Bottom Layer w0.35: C8.2 79.248,108.712 79.756,108.204 79.756,106.68 79.248,106.172 U4.10 ; C6.2 76.454,100.076 76.708,100.33 ; C7.2 76.708,100.33 ; U4.11 U4.10 ; 76.708,100.33 76.454,100.584 76.454,105.664 76.96,106.17 77.976,106.17 U4.10
  Bottom Layer w0.6: C14.2 14.459,106.699 16.764,104.394 22.86,104.394 23.876,105.41 23.876,108.712 25.146,109.982 U8.5 ; DL3.2 12.624,37.922 14.537,36.009 C1.2 ; J4.1 14.158,57.15 15.748,57.15 ; J4.3 15.73,61.45 ; J4.5 14.194,65.786 15.748,65.786 ; J4.7 15.748,69.85 16.51,69.088 16.51,66.548 15.748,65.786 ; R2.1 31.995,23.184 31.995,26.425 U1.5 ; C12.2 52.324,46.95 52.324,50.546 ; D4.1 D4.1@54.418,37.36 ; T1.3 U7.16 67.818,74.93 ; T2.3 64.008,81.28 65.278,82.55 U7.13 67.818,82.55 ; T3.3 64.008,86.36 65.278,85.09 U7.12 67.818,85.09 ; T4.3 U7.9 67.818,92.71 68.58,91.948 68.58,85.852 67.818,85.09 ; U6.5 69.812,40.562 69.812,37.67 R12.1 ; U7.2 72.898,77.47 ; U7.3 72.898,80.01 ; U7.6 72.898,87.63 ; U7.7 72.898,90.17 72.136,89.408 72.136,88.392 72.898,87.63 ; 80.518,71.12 73.406,71.12 72.136,72.39 72.136,76.708 72.898,77.47 ; C5.2 C5.2@107.501,37.413 ; 114.808,46.482 116.078,47.752 118.872,47.752 119.888,48.768 DL1.2 ; 127.508,19.304 128.524,20.32 U3.4 ; 15.73,61.45 16.51,60.67 16.51,57.912 15.748,57.15 ; 15.73,61.45 16.51,62.23 16.51,65.024 15.748,65.786 ; 15.748,57.15 16.51,56.388 16.51,55.372 17.78,54.102 48.768,54.102 52.324,50.546 ; 52.324,50.546 68.58,66.802 68.58,74.168 67.818,74.93 ; 67.818,74.93 68.58,75.692 68.58,81.788 67.818,82.55 ; 67.818,82.55 68.58,83.312 68.58,84.328 67.818,85.09 ; 72.898,77.47 72.136,78.232 72.136,79.248 72.898,80.01 ; 72.898,80.01 72.136,80.772 72.136,86.868 72.898,87.63
  Bottom Layer w1.2: C14.2 8.89,100.33 6.858,98.298 6.858,50.546 ; D1.1 16.823,24.911 21.903,29.991 27.745,29.991 ; U1.3 28.555,26.485 28.555,29.181 ; U1.5 32.005,29.033 31.047,29.991 29.365,29.991 28.555,29.181 ; C2.2 42.651,32.785 29.523,32.785 28.507,31.769 ; D4.1@54.418,37.36 54.418,39.138 59.396,44.116 65.572,44.116 ; U6.3 66.334,43.354 ; U6.5 69.734,43.51 69.128,44.116 67.096,44.116 66.334,43.354 ; C6.2 76.454,96.266 81.788,90.932 81.788,72.39 80.518,71.12 81.788,69.85 81.788,59.182 83.82,57.15 91.694,57.15 92.964,58.42 ; v2(87.376,46.736) 78.994,46.736 77.866,45.608 77.866,44.258 C13.2 74.716,44.196 71.922,46.99 67.176,46.99 66.334,46.148 ; JE3.25 95.758,70.104 92.964,67.31 J5.3 92.964,58.42 ; J7.4 100.798,15.24 ; v2(102.108,57.15) 94.234,57.15 92.964,58.42 ; DL2.2 102.87,17.312 100.798,15.24 ; R4.1 103.124,36.576 103.902,37.354 ; C5.2 103.902,37.354 ; C5.2@107.501,37.413 108.533,37.413 109.22,38.1 C4.2 113.538,47.752 ; v2(109.22,57.15) 109.22,58.42 109.982,59.182 112.776,59.182 114.808,57.15 114.808,49.022 113.538,47.752 ; C16.2 117.348,16.51 ; U3.7 126.492,15.24 127.508,16.256 127.508,19.304 126.492,20.32 U3.5 121.158,20.32 117.348,16.51 ; 6.858,50.546 10.494,46.91 C12.2 65.572,46.91 66.334,46.148 ; 6.858,50.546 5.588,49.276 5.588,35.56 8.403,32.745 C1.2 27.531,32.745 28.507,31.769 ; 27.745,29.991 28.555,29.181 ; 27.745,29.991 28.507,30.753 28.507,31.769 ; 65.572,44.116 66.334,43.354 ; 65.572,44.116 66.334,44.878 66.334,46.148 ; 100.798,15.24 98.258,17.78 96.012,17.78 93.98,19.812 93.98,23.368 88.9,28.448 88.9,32.766 87.376,34.29 v2(87.376,41.656) C3.2 99.6,41.656 103.902,37.354 ; 113.538,47.752 114.808,46.482 114.808,19.05 117.348,16.51
GND1: JC1.1 JC2.1 JE1.1 | length 111.4
  Bottom Layer w0.6: JE1.1 95.758,110.236 94.488,111.506 94.488,114.3 126.238,146.05 JC1.1 151.638,147.32 152.146,147.828 155.448,147.828 158.75,144.526 158.75,131.572 151.638,124.46 JC2.1
GND2: JC3.1 JC4.1 JE2.1 | length 55.2
  Top Layer w0.6: v2(141.478,87.63) v2(141.478,102.87)
  Bottom Layer w0.6: JE2.1 133.35,106.934 134.366,107.95 137.668,107.95 141.478,104.14 v2(141.478,102.87) 144.018,102.87 146.558,100.33 JC3.1 ; v2(141.478,87.63) 144.018,87.63 151.638,80.01 JC4.1
NetC1_1: C1.1 C12.1 C14.1 C15.1 DP1.1 DZ1.2 R25.2 RDET.2 U1.1 U6.1 U8.8 | length 267.9
  Bottom Layer w0.6: 19.558,117.348 21.336,115.57 U8.8 DZ1.2
  Bottom Layer w1.2: DP1.1 13.329,125.576 17.167,121.738 19.486,121.738 RDET.2 19.558,117.348 15.494,113.284 R25.2 8.951,111.76 C14.1 8.81,111.779 6.35,111.779 2.54,107.969 2.54,30.051 10.6,21.99 ; C1.1 14.537,23.641 12.886,21.99 ; C15.1 DZ1.2 ; U1.1 23.427,26.435 22.157,25.165 22.157,22.625 19.617,20.085 14.791,20.085 12.886,21.99 ; C12.1 50.546,41.91 49.022,40.386 49.022,35.56 50.292,34.29 ; U6.1 61.254,40.64 58.714,38.1 58.714,36.576 56.428,34.29 50.292,34.29 ; 10.6,21.99 12.886,21.99 ; 10.6,21.99 9.398,20.788 9.398,17.272 20.32,6.35 46.482,6.35 49.022,8.89 49.022,33.02 50.292,34.29
NetC3_1: C3.1 C13.1 D3.2 J7.1 L2.2 R11.2 RL2.2 U2.3 | length 104.9
  Bottom Layer w0.6: R11.2 80.518,43.394 81.32,44.196 C13.1 ; 87.63,22.86 88.9,21.59 RL2.2 ; U2.3 D3.2
  Bottom Layer w1.2: L2.2 70.884,11.194 76.962,17.272 76.962,25.908 82.804,31.75 ; J7.1 93.798,15.24 92.528,16.51 88.9,16.51 86.36,19.05 86.36,21.59 87.63,22.86 87.63,26.924 82.804,31.75 ; U2.3 C3.1 C13.1 82.804,31.75
NetC5_1: C5.1 D2.1 R3.1 R4.2 U2.1 | length 18.1
  Bottom Layer w0.6: U2.1 R4.2 105.41,44.196 ; D2.1 R3.1 106.517,46.827 106.517,45.303 105.41,44.196 ; C5.1 107.442,42.164 105.41,44.196
NetC15_2: C15.2 DP1.3 DZ1.1 RCLASS.1 RILIM.1 U8.4 | length 42.4
  Bottom Layer w1.2: DP1.3 17.139,127.1 19.05,129.011 27.94,129.011 28.884,128.067 28.884,126.818 RCLASS.1 RILIM.1 28.956,122.936 29.21,122.682 29.21,120.142 28.194,119.126 ; 25.451,119.126 28.194,119.126 ; C15.2 28.836,108.084 29.972,109.22 ; DZ1.1 29.972,109.22 ; 28.194,119.126 28.956,118.364 28.956,110.236 29.972,109.22
NetD1_2: D1.2 L1.1 U1.2 | length 11.2
  Bottom Layer w0.6: U1.2 U1.2@26.944,26.396 ; D1.2@26.944,23.172 D1.2
  Bottom Layer w1.2: D1.2@26.944,23.172 U1.2@26.944,26.396 ; L1.1 D1.2
NetD4_2: D4.2 L2.1 U6.2 | length 12.5
  Bottom Layer w0.6: D4.2 D4.2@64.595,37.377 ; U6.2@64.595,40.601 U6.2
  Bottom Layer w1.2: L2.1 D4.2 ; D4.2@64.595,37.377 U6.2@64.595,40.601
NetDI1_2: DI1.2 RA1.2 RF1.1 | length 35.7
  Bottom Layer w0.35: DI1.2 38.608,93.98 43.688,99.06 RA1.2 46.228,100.33 47.498,101.6 RF1.1
NetDI2_2: DI2.2 RA2.2 RF2.1 | length 37
  Bottom Layer w0.35: DI2.2 37.084,97.536 43.688,104.14 RA2.2 46.228,105.41 47.498,106.68 RF2.1
NetDI3_2: DI3.2 RA3.2 RF3.1 | length 38.7
  Bottom Layer w0.35: DI3.2 35.56,101.092 43.688,109.22 RA3.2 46.228,110.49 47.498,111.76 RF3.1
NetDI4_2: DI4.2 RA4.2 RF4.1 | length 40.1
  Bottom Layer w0.35: DI4.2 34.036,104.648 43.688,114.3 RA4.2 46.228,115.57 47.498,116.84 RF4.1
NetDL1_1: DL1.1 RL1.1 | length 2.8
  Bottom Layer w0.6: DL1.1 RL1.1
NetDL2_1: DL2.1 RL2.1 | length 5.1
  Bottom Layer w0.6: RL2.1 DL2.1
NetDL3_1: DL3.1 RL3.1 | length 3.8
  Bottom Layer w0.6: DL3.1 RL3.1
NetDP1_2: DP1.2 J6A.4 J6A.5 | length 39.3
  Bottom Layer w1.2: J6A.5 8.652,142.494 9.398,142.494 10.362,141.53 ; J6A.4 11.216,141.45 15.807,141.45 16.51,140.747 16.51,133.35 15.24,132.08 8.636,132.08 7.366,130.81 7.366,123.677 9.144,121.899 DP1.2
NetDP1_4: DP1.4 J6A.7 J6A.8 | length 29
  Bottom Layer w1.2: J6A.7 8.692,144.55 9.672,145.53 11.136,145.53 J6A.8 11.216,145.53 16.522,145.53 19.05,143.002 19.05,133.115 15.303,129.368 13.577,129.368 DP1.4
NetJ1_3: J1.3 U3.3 | length 22.8
  Bottom Layer w0.6: U3.3 148.502,17.78 149.772,19.05 J1.3
NetJ1_4: J1.4 R9.2 | length 11.7
  Bottom Layer w0.6: R9.2 J1.4
NetJ2_2: J2.2 R5.1 | length 3.1
  Bottom Layer w0.6: R5.1 J2.2@144.062,40.894
NetR1_1: R1.1 R2.2 U1.4 | length 16.2
  Bottom Layer w0.6: U1.4 30.305,21.003 30.988,20.32 R1.1 34.29,20.32 37.143,23.173 R2.2 R2.2@39.624,23.154
NetR5_2: R5.2 R6.1 | length 2.5
  Bottom Layer w0.6: R6.1 R5.2
NetR6_2: R6.2 U3.1 | length 66.5
  Bottom Layer w0.6: U3.1 149.098,12.7 154.178,17.78 154.178,41.656 151.892,43.942 139.954,43.942 138.43,42.418 R6.2 R6.2@138.474,40.938
NetR8_2: R8.2 R9.1 | length 7.6
  Bottom Layer w0.6: R8.2 R9.1
NetR11_1: R11.1 R12.2 U6.4 | length 15.8
  Bottom Layer w0.6: U6.4 68.034,36.36 69.342,35.052 69.89,35.052 R11.1@72.43,35.052 ; R11.1 72.898,36.576 73.914,37.592 R12.2
NetR13_2: R13.2 U7.1 | length 6.9
  Bottom Layer w0.6: U7.1 75.438,74.93 76.708,76.2 R13.2
NetR14_1: R14.1 T1.1 U7.15 | length 11.4
  Bottom Layer w0.6: R14.1 T1.1 U7.15
NetR16_2: R16.2 U7.4 | length 2.5
  Bottom Layer w0.6: U7.4 R16.2
NetR17_1: R17.1 T2.1 U7.14 | length 15.9
  Bottom Layer w0.6: R17.1 T2.1 60.198,80.01 60.96,79.248 64.516,79.248 65.278,80.01 U7.14
NetR19_2: R19.2 U7.5 | length 2.5
  Bottom Layer w0.6: U7.5 R19.2
NetR20_1: R20.1 T3.1 U7.11 | length 12
  Bottom Layer w0.6: R20.1 T3.1 64.008,88.9 65.278,87.63 U7.11
NetR22_2: R22.2 U7.8 | length 6.9
  Bottom Layer w0.6: U7.8 75.438,92.71 76.708,91.44 R22.2
NetR23_1: R23.1 T4.1 U7.10 | length 15.8
  Bottom Layer w0.6: R23.1 T4.1 60.198,91.44 61.468,90.17 U7.10
NetR25_1: R25.1 U8.6 | length 2.7
  Bottom Layer w0.6: R25.1 23.114,111.8 23.876,112.562 U8.6
NetRCLASS_2: RCLASS.2 U8.2 | length 9.3
  Bottom Layer w0.6: RCLASS.2 21.499,126.583 22.763,126.583 23.114,126.231 23.114,123.444 22.606,122.936 U8.2
NetRDET_1: RDET.1 U8.3 | length 5.5
  Bottom Layer w0.6: U8.3 23.876,121.158 24.384,121.666 RDET.1
NetRILIM_2: RILIM.2 U8.1 | length 5.1
  Bottom Layer w0.6: U8.1 RILIM.2
PA0: JC3.2 JE2.4 | length 29.1
  Top Layer w0.6: v2(138.938,102.87) v2(138.938,109.22)
  Bottom Layer w0.6: JE2.4 v2(138.938,102.87) ; v2(138.938,109.22) 146.558,109.22 154.158,101.62 154.158,100.35 JC3.2
PA13: J5.4 JE3.17 | length 29.3
  Bottom Layer w0.35: J5.4 90.424,67.056 95.758,72.39 107.696,72.39 108.204,71.882 JE3.17
PA14: J5.2 JE3.18 | length 21.8
  Bottom Layer w0.35: J5.2 95.504,67.818 96.52,68.834 106.934,68.834 JE3.18
PB1: JC2.2 JE1.16 | length 59.1
  Bottom Layer w0.6: JE1.16 115.824,114.808 116.586,115.57 144.018,115.57 149.098,110.49 155.448,110.49 156.718,111.76 156.718,121.92 155.448,123.19 JC2.2
PB6: JE2.24 R7.1 U3.8 | length 108.2
  Bottom Layer w0.6: R7.1 U3.8 126.238,12.7 128.778,10.16 149.098,10.16 156.718,17.78 156.718,54.61 138.938,72.39 138.938,76.708 138.176,77.47 JE2.24
PB8: JE2.20 R10.1 U3.6 | length 129.5
  Bottom Layer w0.6: U3.6 122.428,17.78 119.888,15.24 R10.1 119.888,11.43 123.698,7.62 149.098,7.62 157.988,16.51 157.988,55.88 140.208,73.66 140.208,80.01 137.668,82.55 JE2.20
PC3: JC3.3 JE2.6 | length 16.8
  Bottom Layer w0.6: JE2.6 142.748,100.33 145.288,97.79 JC3.3
PC7: JE4.8 R16.1 | length 3.8
  Bottom Layer w0.6: R16.1 JE4.8
PC9: JE4.6 R13.1 | length 3.8
  Bottom Layer w0.6: R13.1 JE4.6
PD13: JE4.12 R22.1 | length 3.8
  Bottom Layer w0.6: R22.1 JE4.12
PD15: JE4.10 R19.1 | length 3.8
  Bottom Layer w0.6: R19.1 JE4.10
PE0: JC4.5 JE2.18 | length 22.5
  Bottom Layer w0.6: JE2.18 137.668,85.09 144.018,78.74 144.018,76.2 147.828,72.39 JC4.5
PE2: JC4.3 JE2.16 | length 21.8
  Bottom Layer w0.6: JE2.16 137.668,87.63 146.558,78.74 146.558,77.47 149.098,74.93 JC4.3
PE4: JC4.2 JE2.14 | length 25
  Bottom Layer w0.6: JE2.14 144.018,90.17 154.178,80.01 JC4.2
PE6: JC3.5 JE2.12 | length 16.8
  Bottom Layer w0.6: JE2.12 142.748,92.71 145.288,95.25 JC3.5
PE7: JC2.5 JE1.14 | length 42.1
  Bottom Layer w0.6: JE1.14 113.284,115.316 116.078,118.11 JC2.5
PE9: JC2.3 JE1.12 | length 46.4
  Bottom Layer w0.6: JE1.12 110.744,116.586 114.808,120.65 JC2.3
PE11: JC1.2 JE1.10 | length 73.9
  Bottom Layer w0.6: JE1.10 108.204,118.11 122.428,132.334 154.432,132.334 156.718,134.62 156.718,144.78 155.448,146.05 JC1.2
PE13: JC1.5 JE1.8 | length 60.6
  Bottom Layer w0.6: JE1.8 105.664,117.856 128.778,140.97 JC1.5
PE15: JC1.3 JE1.6 | length 65
  Bottom Layer w0.6: JE1.6 103.124,119.126 127.508,143.51 JC1.3
PLC_GND: J2.1 U3.2 | length 46.3
  Bottom Layer w0.6: U3.2 149.098,15.24 152.908,19.05 152.908,39.878 151.756,41.03 J2.1
RA1: C9.1 RF1.2 U4.2 | length 10.5
  Bottom Layer w0.35: C9.1 RF1.2 67.818,101.6 69.24,103.022 U4.2
RA2: C10.1 RF2.2 U4.3 | length 10.1
  Bottom Layer w0.35: RF2.2 C10.1 67.818,104.14 68.326,103.632 U4.3
RA3: C11.1 RF3.2 U4.4 | length 13.3
  Bottom Layer w0.35: RF3.2 C11.1 66.548,109.22 67.818,107.95 67.818,105.664 69.19,104.292 U4.4
RA4: C17.1 RF4.2 U4.5 | length 17.2
  Bottom Layer w0.35: RF4.2 C17.1 66.548,114.3 69.088,111.76 69.088,105.918 70.104,104.902 U4.5
RST: J5.5 JE2.10 | length 66.3
  Bottom Layer w0.35: J5.5 87.884,65.786 116.078,93.98 134.62,93.98 JE2.10
"RX+ POE": J6A.3 JE4.23 | length 117.6
  Top Layer w0.35: v1(14.732,135.382) v1(24.13,135.382)
  Bottom Layer w0.35: J6A.3 7.374,140.47 6.35,139.446 6.35,137.668 8.636,135.382 v1(14.732,135.382) ; v1(24.13,135.382) 24.13,142.24 26.67,144.78 48.26,144.78 88.9,104.14 91.948,104.14 JE4.23
"RX- POE": J6A.6 JE4.24 | length 96.3
  Top Layer w0.35: v1(14.732,143.51) v1(29.21,143.51)
  Bottom Layer w0.35: J6A.6 11.186,143.52 14.722,143.52 v1(14.732,143.51) ; v1(29.21,143.51) 48.26,143.51 88.9,102.87 JE4.24
"TX+ POE": J6A.1 JE4.25 | length 109.9
  Top Layer w0.35: v1(14.732,137.414) v1(21.59,137.414)
  Bottom Layer w0.35: J6A.1 9.652,137.414 v1(14.732,137.414) ; v1(21.59,137.414) 21.59,143.256 25.654,147.32 48.26,147.32 88.9,106.68 91.948,106.68 JE4.25
"TX- POE": J6A.2 JE4.26 | length 101
  Top Layer w0.35: v1(14.732,139.446) v1(22.86,139.446)
  Bottom Layer w0.35: J6A.2 14.728,139.45 v1(14.732,139.446) ; v1(22.86,139.446) 22.86,142.748 26.162,146.05 48.26,146.05 88.9,105.41 JE4.26
pads on no net: "SUJECION 1.1" "SUJECION 2.1" "SUJECION 3.1" "SUJECION 4.1" "SUJECION 5.1" J1.1 J1.2 J2.3 J2.4 J5.6 J6A. J7.2 J7.3 J7.SH1 J7.SH2 JC1.4 JC1.6 JC1.7 JC1.8 JC1.9 JC1.10 JC2.4 JC2.6 JC2.7 JC2.8 JC2.9 JC2.10 JC3.4 JC3.6 JC3.7 JC3.8 JC3.9 JC3.10 JC4.4 JC4.6 JC4.7 JC4.8 JC4.9 JC4.10 JE1.2 JE1.3 JE1.4 JE1.5 JE1.7 JE1.9 JE1.11 JE1.13 JE1.15 JE1.17 JE1.18 JE1.19 JE1.20 JE1.22 JE1.23 JE1.24 JE1.25 JE1.26 JE2.2 JE2.3 JE2.5 JE2.7 JE2.8 JE2.9 JE2.11 JE2.13 JE2.15 JE2.17 JE2.19 JE2.21 JE2.22 JE2.23 JE2.25 JE2.26 JE3.1 JE3.2 JE3.3 JE3.4 JE3.5 JE3.6 JE3.7 JE3.8 JE3.9 JE3.10 JE3.11 JE3.12 JE3.13 JE3.14 JE3.15 JE3.16 JE3.19 JE3.20 JE3.21 JE3.22 JE3.23 JE3.24 JE4.1 JE4.2 JE4.3 JE4.4 JE4.5 JE4.7 JE4.9 JE4.11 JE4.13 JE4.14 JE4.15 JE4.19 JE4.21 JE4.22 L1.NC U1.6 U2.4 U6.6 U8.7

## Keep-outs
Keep-Out Layer:
  the board outline again, w0.254

## Silkscreen, mask and mechanical layers (free items; w line width, h text height)
Top Overlay:
  circle w0.5: c100.33,59.69 r0.254
  lines w0.254: 89.408,66.294 137.16,66.294 137.16,114.046 89.408,114.046 89.408,66.294
  text "COMECA - v1.0" at 12.7,155.448 h1.52
  text "EA" at 2.54,77.47 h1.52 r270
  text "GND" at 13.208,77.47 h1.52 r270
  text "DO4" at 21.59,69.088 h1.52
  text "DO3" at 21.59,65.024 h1.52
  text "DO2" at 21.59,60.706 h1.52
  text "DO1" at 21.59,56.642 h1.52
  text "SD" at 2.54,53.34 h1.52 r270
  text "GND" at 13.208,53.086 h1.52 r270
  text "3V3" at 117.856,47.752 h1.52
  text "+" at 145.034,45.72 h1.52 r90
  text "-" at 150.622,45.72 h1.52 r90
  text "PLC" at 160.02,45.72 h1.52 r90
  text "24V" at 15.494,37.338 h1.52 r90
  text "SW" at 145.034,17.78 h1.52 r90
  text "SW" at 150.622,17.78 h1.52 r90
  text "5V" at 101.6,16.256 h1.52
  text "PEDAL" at 160.02,13.208 h1.52 r90

## Text inside footprints (layer, text, board x,y; h text height)
C1: Top Overlay "+" at 13.293,27.121 h1.27 r90
C2: Top Overlay "+" at 41.427,27.141 h1.27 r90
C5: Top Overlay "+" at 108.61,39.802 h1.02 r270
C12: Top Overlay "+" at 51.119,41.286 h1.27 r90
C13: Top Overlay "+" at 83.428,42.951 h1.27 r180
C14: Top Overlay "+" at 10.135,112.323 h1.27 r270
DP1: Top Overlay "+" at 12.462,125.076 h1.52 r90